# Altium PCB LED_PCB.PcbDoc
Units mm, origin at the board's own origin, x right, y up, seen from the top; angles counter-clockwise.
Board outline 20 x 15 mm, 2 copper layers (Top Layer, Bottom Layer); 4 components, 4 nets, 10 pads, 5 vias.
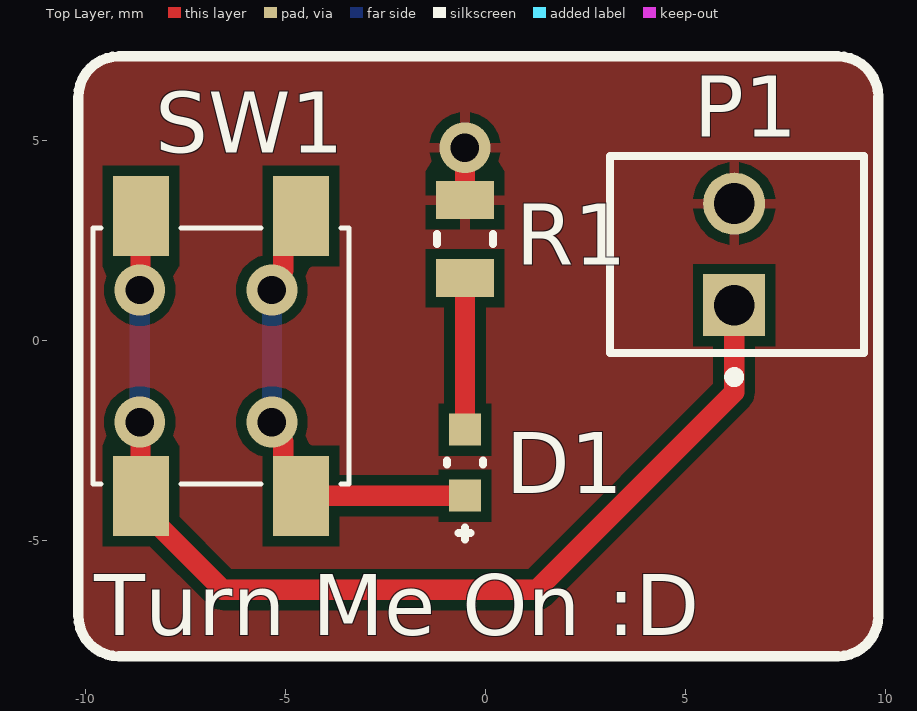
[diagram p0: Top Layer view]
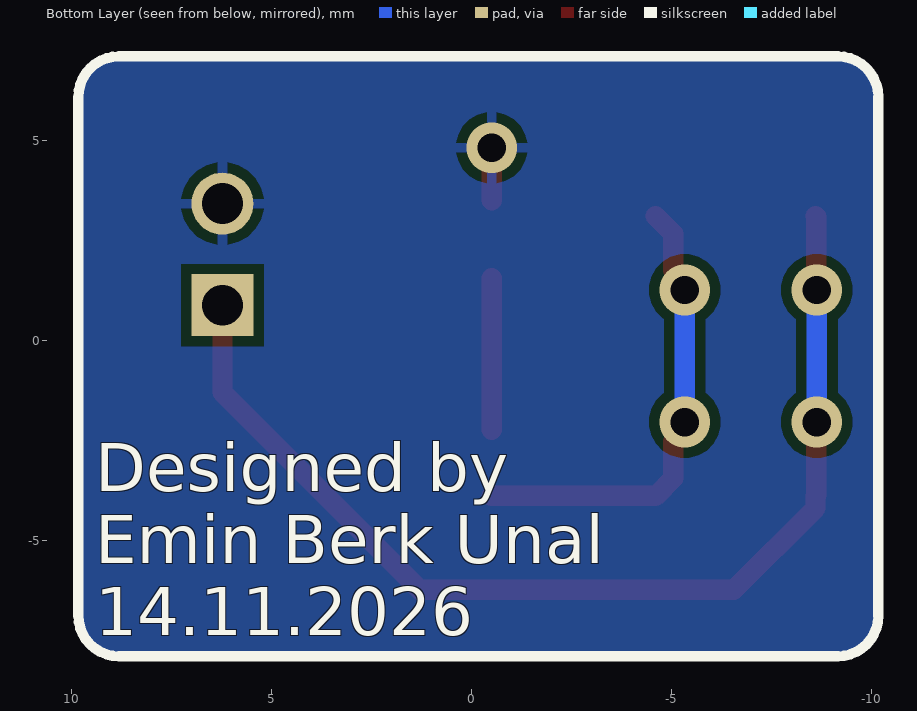
[diagram p1: Bottom Layer view, seen from below]
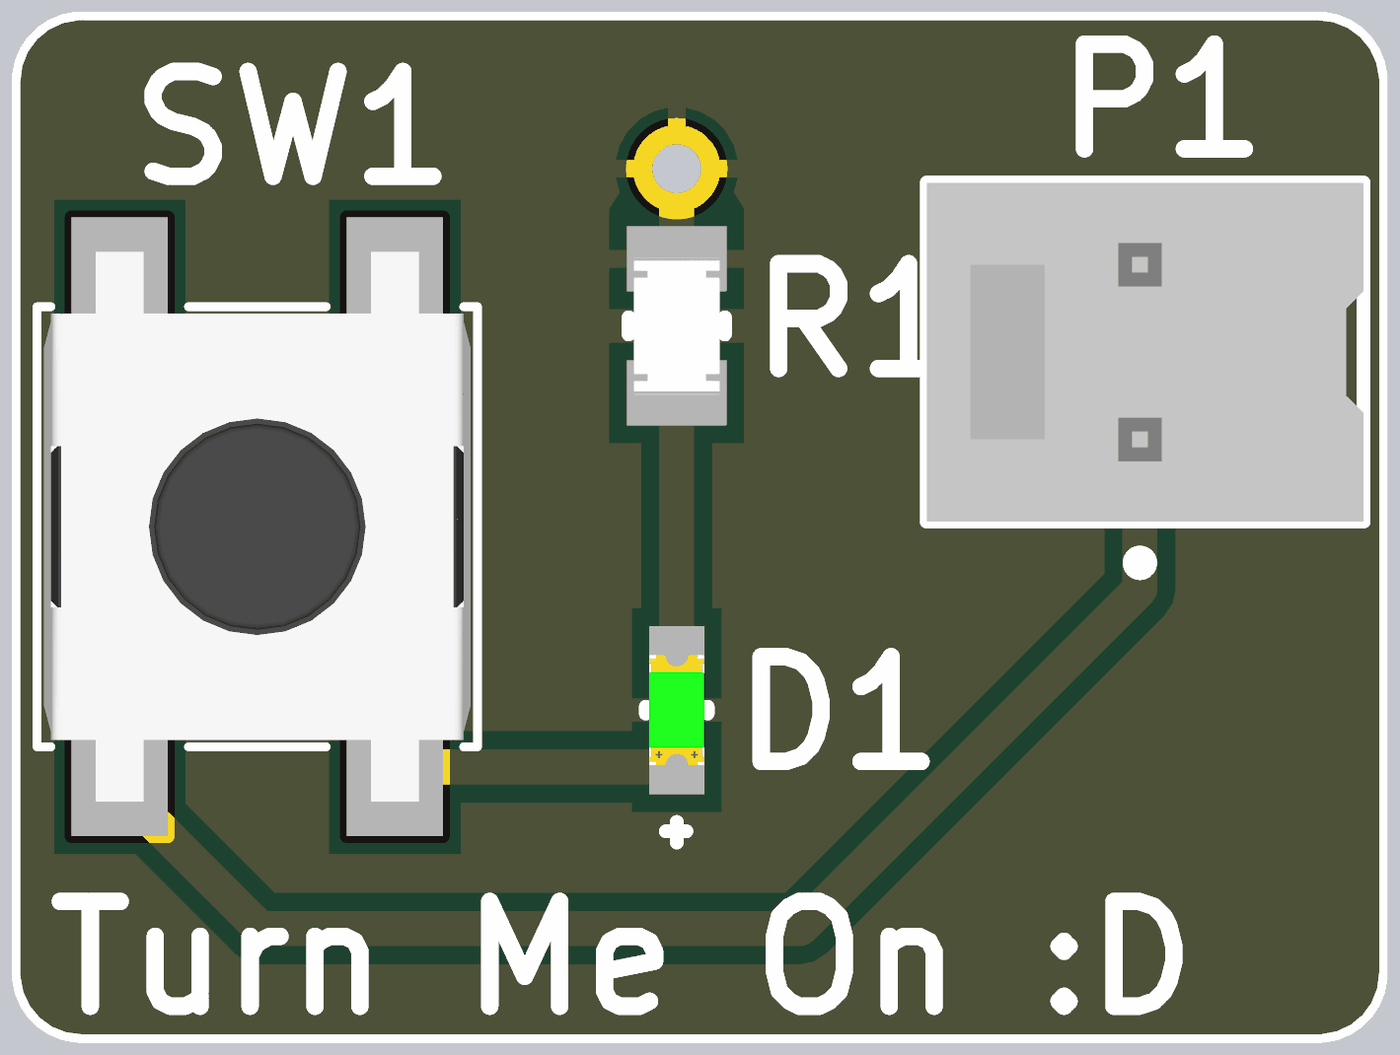
[diagram p2: 3D render of the assembled board from above, using the file's embedded part models]

## Layer stack, top to bottom
Top Solder: solder mask 0.0102, Solder Resist, Dk 3.5
Top Layer: signal copper 0.0356
Dielectric 1: dielectric 0.32, FR-4, Dk 4.8
Bottom Layer: signal copper 0.0356
Bottom Solder: solder mask 0.0102, Solder Resist, Dk 3.5

## Board outline
-10.174,-6.872 -10.174,6.096 cw(c-9.158,6.096) -9.158,7.112 8.81,7.112 cw(c8.81,6.096) 9.826,6.096 9.826,-6.872 cw(c8.81,-6.872) 8.81,-7.888 -9.158,-7.888 cw(c-9.158,-6.872)

## Design rules (kind name [scope] priority, off if disabled: settings)
Clearance [All] p1: gap=0.254 ignorepadtopadclearanceinfootprint=FALSE
PolygonConnect [All] p1: connectstyle=Relief reliefconductorwidth=0.254 reliefentries=4 polygonreliefangle="90 Angle" airgapwidth=0.254
RoutingVias [All] p1: holewidth=0.711 width=1.27 viastyle="Through Hole" minholewidth=0.711 minwidth=1.27 maxholewidth=0.711 maxwidth=1.27
SolderMaskExpansion [All] p1: expansion=0.102 istentingtop=FALSE
SupplyNets "Schematic Supply Nets_1" [InNet('GND')] p1: voltage=0.000
SupplyNets "Schematic Supply Nets" [InNet('+5')] p2: voltage=0.000
Width [All] p1: maxlimit=1 minlimit=0.254 preferedwidth=0.254
30 further rules are at their usual default settings.

## Components (designator, comment, footprint, x,y, rotation, side; value= is the part's Value field where it differs from the comment)
D1 "LNJ337W83RA" FP-LNJ337W83RA-MFG -0.508,-3.048 r90 top
P1 "22-23-2021" MOLX-22-23-2021_V 6.223,2.159 r90 top
R1 "360Ω" FP-CRCW0805-e3-MFG -0.508,2.54 r90 top
SW1 "430451025836" 430451025836 -6.604,-0.381 r90 top

## Footprints (in the part's own frame and the unit in brackets; to place one, negate y for a bottom-side part, rotate by r counter-clockwise, add the part's x,y. Pads: shape width x height; smd on the part's side, far side on the other; paste and mask are expansions set on the pad)
430451025836 [mm] "SMD Tact Switch, body 6x6mm"
  rect 2x1.4 smd: 1(-3.5,2) 2(3.5,2) 3(-3.5,-2) 4(3.5,-2)
  silkscreen extent -3.2,-3.2 3.2,3.2, body extent -4,-3.1 4,3.1, height 2.5
FP-CRCW0805-e3-MFG [mm]
  rect 0.95x1.45 smd paste+0 mask+0: 1(-0.975,0) 2(0.975,0)
  silkscreen extent -0.13,-0.7 0.13,0.7, body extent -1.55,-0.82 1.55,0.82, height 0.25
FP-LNJ337W83RA-MFG [mm]
  rect 0.8x0.8 smd paste+0 mask+0: 1(-0.825,0) 2(0.825,0)
  silkscreen extent -1.92,-0.45 0.05,0.45, body extent -1.33,-0.55 1.33,0.55, height 0.25
MOLX-22-23-2021_V [mm] "THD, 2-Leads, Body 6.35x4.93mm, Pitch 2.54mm"
  rect 1.55x1.55 hole 1.02: 1(-1.27,0)
  round 1.55 hole 1.02: 2(1.27,0)
  silkscreen extent -3.19,-3.25 2.46,3.1, body extent -2.46,-3.25 2.46,3.1, height 10.66

## Part data
D1: library part CMP-05535-000002-1, "LED GREEN ESS II SMD", Ambient Temperature Range High=+85°C, Ambient Temperature Range Low=-30°C, Colour=Green, Forward Current=5mA, Forward Voltage=1.95V, Manufacturer=Panasonic, Power Dissipation=55mW, Reverse Voltage=4V, Temperature="-30°C to +85°C", Automotive=No, Category=Diode, ComponentLink2Description=Datasheet, ComponentLink2URL=https://industrial.panasonic.com/content/data/SC/ds/ds4/LNJ337W83RA_E.pdf, Device Class L1=Optoelectronics, Device Class L2=LEDs, Device Class L3=unset, Digikey Description="LED GREEN ESS II SMD", Height=0.25mm, Lead Free=Yes, Led Orientation="Top View", Luminous Intensity=7.5mcd, Manufacturer Part Number=LNJ337W83RA, Mouser Description="LNJ337W83RA; ESS II Series Yellow-Green LED; 572 nm 1608(0603); Rectangle Lens", Obsolete Part=true, Octopart=https://octopart.com/lnj337w83ra-panasonic-44404387, Package=LNJ337W83RA, Peak Emmision Wavelength=575nm, RoHS=TRUE, Temperature Range High=+85°C, Temperature Range Low=-30°C, Wavelength=572nm
P1: library part CMP-1704-00001-3, "Male Header, Pitch 2.54 mm, 1 x 2 Position, Height 10.67 mm, Tail Length 3.56 mm, 0 to 75 degC, RoHS, Bulk", Max Operating Temperature="75 degC", Min Operating Temperature="0 degC", Package Quantity=3000, ComponentLink1Description="Manufacturer URL", ComponentLink1URL=http://www.molex.com/, ComponentLink2Description=Datasheet, ComponentLink2URL=https://datasheet.ciiva.com/19454/232266-19454304.pdf, Height="10.67 mm", Length="5.08 mm", Mount="Through Hole", Mounting Technology="Through Hole", PackageDescription="Male Header, Pitch 2.54 mm, 1 x 2 Position, Height 10.67 mm, Tail Length 3.56 mm", Packaging=Bulk, PartNumber=22-23-2021, Pins=2, Radiation Hardening=No, REACH SVHC=Unknown, RoHSCompliant=True, Width="6.35 mm"
R1: library part CMP-2001-03843-2, "RES Thick Film, 360Ω, 1%, 0.125W, 100ppm/°C, 0805", Case Code (Imperial)=0805, Case Code (Metric)=2012, Max Operating Temperature=155°C, Max Power Dissipation=125mW, Min Operating Temperature=-55°C, Package Quantity=10, Resistance=360R, Temperature Coefficient=100ppm/°C, Tolerance=1%, Voltage Rating=150V, Case/Package=0805, Composition="Thick Film", Contact Plating=Tin, Depth=1.25mm, Features="Automotive AEC-Q200", Height=0.45mm, Lead Free="Lead Free", Length=2mm, Military Standard=Not, Number of Pins=2, Number of Terminals=2, Number of Terminations=2, Packaging="Tape and Reel", Power Rating=125mW, Radiation Hardening=No, Termination=SMD/SMT, Voltage Rating (DC)=150V, Weight=0.000194oz, Width=0.049inch
SW1: library part CMP-1452-00019-7, "Tactile Switch, 0.05A, 12Vdc, 360Gf, Smd Rohs Compliant: Yes", Current Rating=50mA, Insulation Resistance=100MΩ, Manufacturer Lifecycle Status=ACTIVE, Max Operating Temperature=85°C, Min Operating Temperature=-40°C, Voltage Rating=12V, Actuator Material="Liquid Crystal Polymer, Polymer", Contact Plating=Silver, Height=2.5mm, Illumination Type=Non-Illuminated, Lifecycle Status=Production, Mechanical Life=200kcycles, Mount="Surface Mount", Packaging="Tape and Reel", RoHS=Compliant, Switch Function=Off-Mom, Switch Travel=250µm, Termination=SMD/SMT, Throw Configuration=SPST, YEOL="1 = Estimated lifetime > 10 years"

## Via types
v1: diameter 1.27, hole 0.711, Top Layer to Bottom Layer, 5 vias

## Nets (pads, with @x,y where several pads share a name; then routed paths per layer and width w, separated by ;. In a path a pad name is that pad's centre, name@x,y a point inside that pad or via, vN(x,y) a via of type N, cw(c..) or ccw(c..) an arc to the next point about the centre after c; other vN are vias at no path point)
+5: P1.1 SW1.1 SW1.2 | length 27.2
  Top Layer w0.508: v1(-8.636,-2.032) -8.62,-2.048 -8.62,-3.865 SW1.1 -8.604,-4.181 -6.562,-6.223 1.289,-6.223 6.223,-1.289 P1.1 ; v1(-8.636,1.27) -8.62,1.286 -8.62,3.103 SW1.2
  Bottom Layer w0.508: v1(-8.636,-2.032) v1(-8.636,1.27)
GND: P1.2 R1.2 | length 1.3
  Top Layer w0.508: R1.2 v1(-0.508,4.826)
LED_Cathode: D1.2 R1.1 | length 3.8
  Top Layer w0.508: D1.2 R1.1
VCC: D1.1 SW1.3 SW1.4 | length 11.7
  Top Layer w0.508: v1(-5.334,-2.032) -5.334,-2.238 -5.05,-2.522 -5.05,-3.435 SW1.3 -4.596,-3.873 D1.1 ; v1(-5.334,1.27) -5.334,1.476 -5.05,1.76 -5.05,2.673 SW1.4
  Bottom Layer w0.508: v1(-5.334,-2.032) v1(-5.334,1.27)

## Polygon pours and split planes (outlines as drawn)
GND on Top Layer "TopGND" (solid, pour order 0): -10.174,-6.872 -10.174,6.096 cw(c-9.158,6.096) -9.158,7.112 8.81,7.112 cw(c8.81,6.096) 9.826,6.096 9.826,-6.872 cw(c8.81,-6.872) 8.81,-7.888 -9.158,-7.888 cw(c-9.158,-6.872)
GND on Bottom Layer "BottomGND" (solid, pour order 1): -10.174,-6.872 -10.174,6.096 cw(c-9.158,6.096) -9.158,7.112 8.81,7.112 cw(c8.81,6.096) 9.826,6.096 9.826,-6.872 cw(c8.81,-6.872) 8.81,-7.888 -9.158,-7.888 cw(c-9.158,-6.872)

## Silkscreen, mask and mechanical layers (free items; w line width, h text height)
Top Overlay:
  the board outline again, w0.254
  text "Turn Me On :D" at -9.779,-7.366 h1.52
Bottom Overlay:
  the board outline again, w0.254
  text "Designed by / Emin Berk Unal / 14.11.2026" at 9.398,-7.366 h1.2
Mechanical 1:
  the board outline again, w0.254